# Altium PCB nexnclock_one_mainboard_rev_1_0.PcbDoc (part 1 of 2)
Units mm, origin at the board's own origin, x right, y up, seen from the top; angles counter-clockwise.
Board outline 106 x 35 mm, 2 copper layers (Top Layer, Bottom Layer), stack 1.571 mm thick; 128 components, 112 nets, 447 pads, 312 vias.
Unrouted connection lines stored in the file: 3.
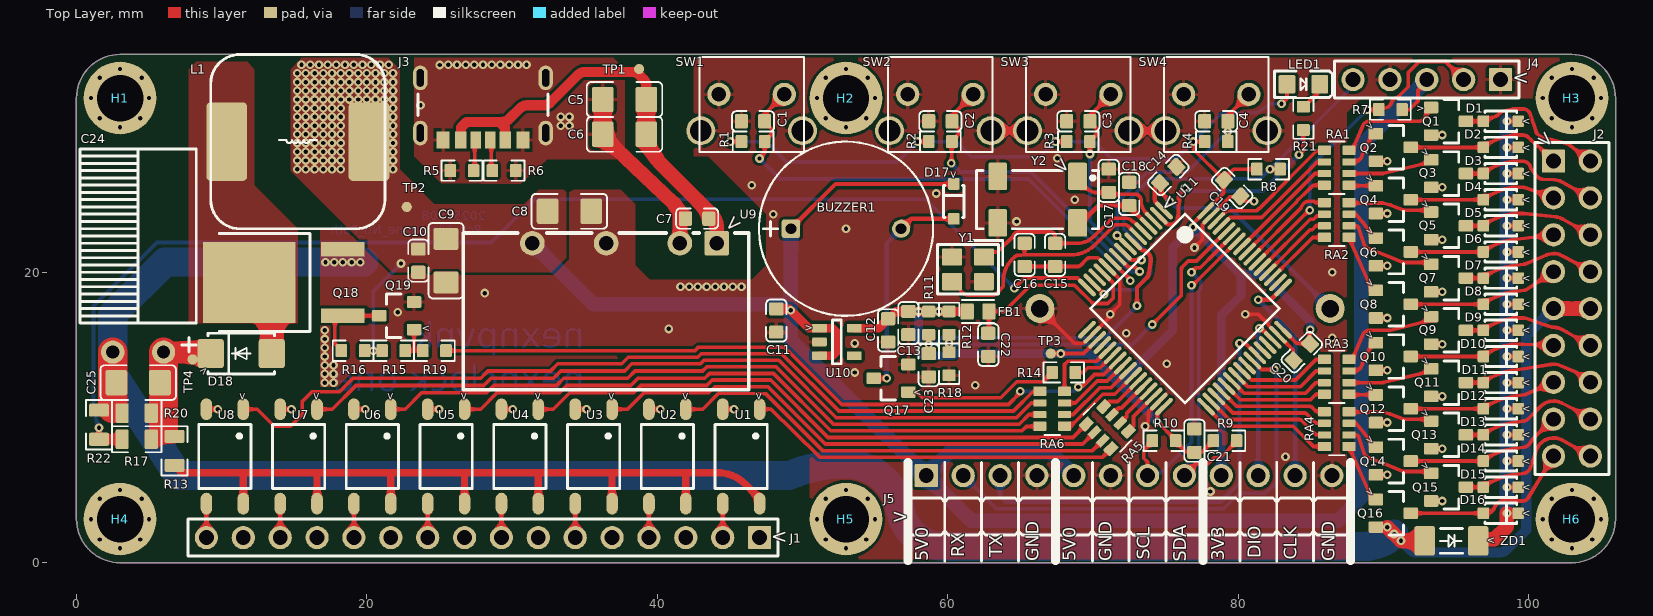
[diagram p0: Top Layer view]
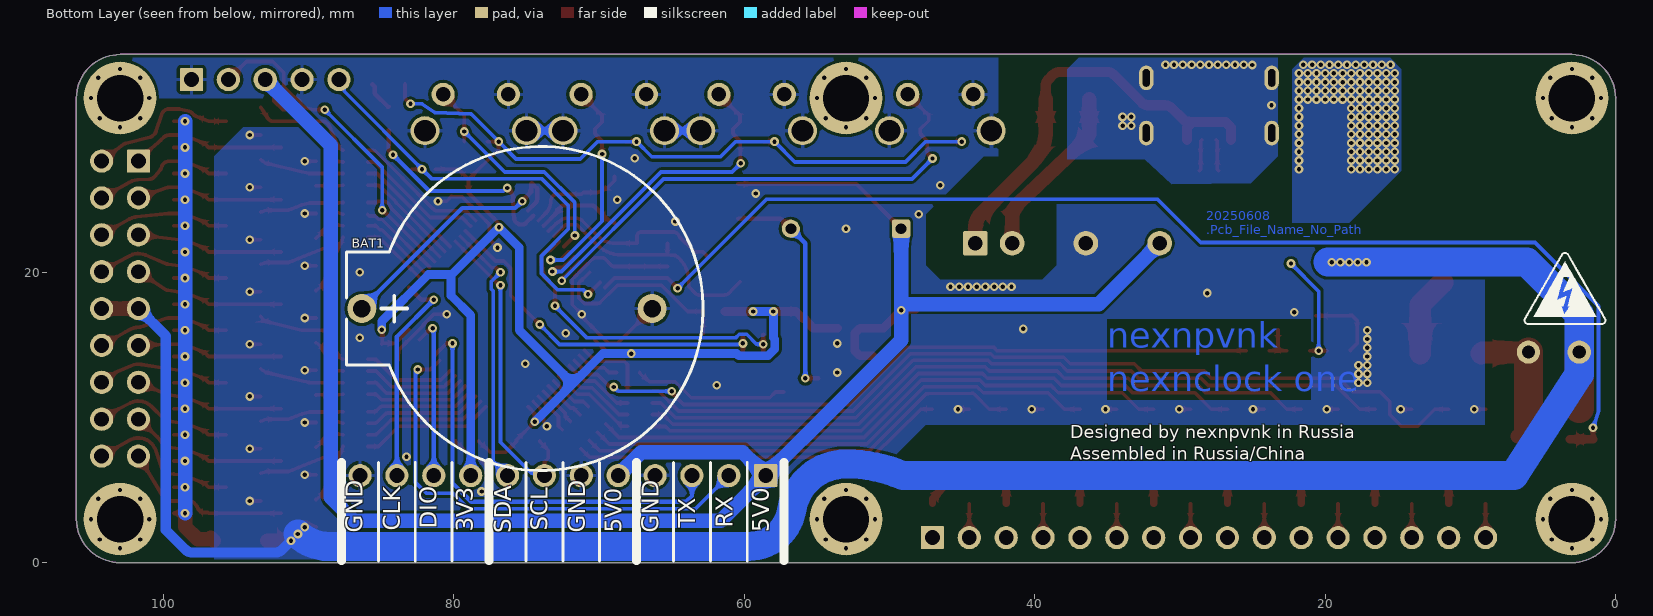
[diagram p1: Bottom Layer view, seen from below]
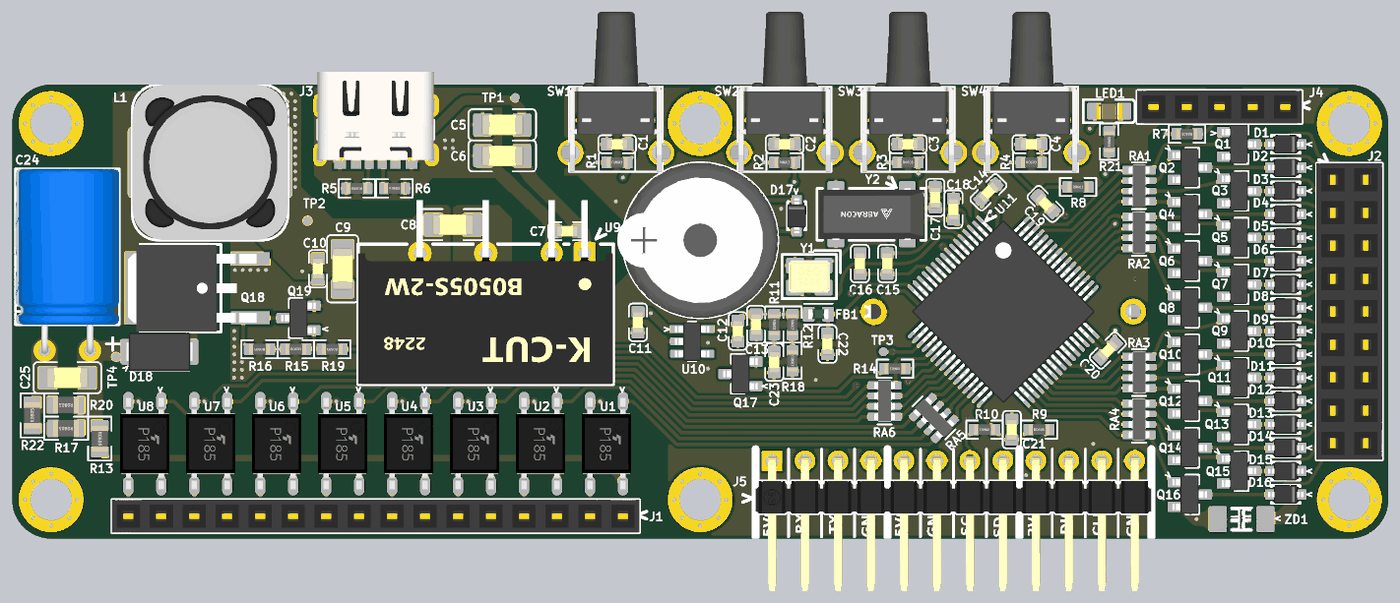
[diagram p3: 3D render of the assembled board from above, using the file's embedded part models]

## Layer stack, top to bottom
Top Solder: solder mask 0.0102, Solder Resist, Dk 3.5
Top Layer: signal copper 0.0356
Dielectric 1: dielectric 1.5, FR-4, Dk 4.8
Bottom Layer: signal copper 0.0356
Bottom Solder: solder mask 0.0102, Solder Resist, Dk 3.5

## Board outline
0,3 0,32 cw(c3,32) 3,35 103,35 cw(c103,32) 106,32 106,3 cw(c103,3) 103,0 3,0 cw(c3,3)

## Design rules (kind name [scope] priority, off if disabled: settings)
Clearance [All] p1: gap=0.2 ignorepadtopadclearanceinfootprint=FALSE except(0: Arc-Text Track-Text SMDPad-Text THPad-Text Via-Text Fill-Text Poly-Text Region-Text Text-Text; 0.127: THPad-THPad; 0.3: Arc-THPad Track-THPad SMDPad-THPad)
ComponentClearance ComponentClearance_1 [(Footprint = 'B_S-2WR2_FLAT')] p1: gap=-5 collisioncheckmode=3 verticalgap=-5 showdistances=FALSE
ComponentClearance [All] p2: gap=0 collisioncheckmode=3 verticalgap=0 showdistances=FALSE
DiffPairsRouting [All] p1: maxlimit=1 minlimit=0.127 mostfreqgap=0.3 toplayer_minwidth=0.127 toplayer_maxwidth=0.381 toplayer_prefwidth=0.3 bottomlayer_minwidth=0.127 bottomlayer_maxwidth=0.381 bottomlayer_prefwidth=0.3 maxuncoupledlength=12.7
Height [All] p1: minheight=0 maxheight=100 prefheight=12.7
HoleSize [All] p1: absolutevalues=TRUE maxlimit=5 minlimit=0.025 maxpercent=80.000 minpercent=20.000
HoleToHoleClearance [All] p1: gap=0.127 allowstackedmicrovias=TRUE
MinimumSolderMaskSliver [All] p1: minsoldermaskwidth=0.05
PolygonConnect PolygonConnect_1 [All] p1: thpad.connectstyle=Relief thpad.reliefconductorwidth=0.254 thpad.reliefentries=4 thpad.polygonreliefangle="90 Angle" thpad.airgapwidth=0.2 smdpad.connectstyle=Relief smdpad.reliefconductorwidth=0.254 smdpad.reliefentries=4 smdpad.polygonreliefangle="90 Angle" smdpad.airgapwidth=0.2 via.connectstyle=Direct via.reliefconductorwidth=0.254 via.reliefentries=4 via.polygonreliefangle="90 Angle" via.airgapwidth=0.254
RoutingVias [All] p1: holewidth=0.3 width=0.6 viastyle="Through Hole" minholewidth=0.1 minwidth=0.3 maxholewidth=1 maxwidth=1.27
SilkToSilkClearance [All] p1: silktosilkclearance=0
SilkToSolderMaskClearance [IsPad] p1: minsilkscreentomaskgap=0.127 clearancetoexposedcopper=TRUE
SolderMaskExpansion [All] p1: expansion=0.05 istentingtop=FALSE
SupplyNets "Schematic Supply Nets_6" [InNet('VCC_3V3')] p1: voltage=0.000
SupplyNets "Schematic Supply Nets_5" [InNet('VBUS')] p2: voltage=0.000
SupplyNets "Schematic Supply Nets_4" [InNet('RAW_GND')] p3: voltage=0.000
SupplyNets "Schematic Supply Nets_3" [InNet('VCC_HV')] p4: voltage=0.000
SupplyNets "Schematic Supply Nets_1" [InNet('VCC_5V0')] p5: voltage=0.000
SupplyNets "Schematic Supply Nets" [InNet('GND')] p6: voltage=0.000
Width [All] p1: maxlimit=6 minlimit=0.2 preferedwidth=0.3
22 further rules are at their usual default settings.

## Classes and differential pairs
component class hot_handle_part: D1 D2 D3 D4 D5 D6 D7 D8 D9 D10 D11 D12 D13 D14 D15 D16 J1 J2 Q1 Q2 Q3 Q4 Q5 Q6 Q7 Q8 Q9 Q10 Q11 Q12 Q13 Q14 Q15 Q16 RA1 RA2 RA3 RA4 RA5 RA6 U1 U2 U3 U4 U5 U6 U7 U8 ZD1
component class main: BAT1 BUZZER1 C1 C2 C3 C4 C5 C6 C7 C8 C9 C10 C11 C12 C13 C14 C15 C16 C17 C18 C19 C20 C21 C22 C23 C24 C25 D17 D18 FB1 H1 H2 H3 H4 H5 H6 J3 J4 J5 L1 LED1 Q17 Q18 Q19 R1 R2 R3 R4 R5 R6 R7 R8 R9 R10 R11 R12 R13 R14 R15 R16 R17 R18 R19 R20 R21 R22 SW1 SW2 SW3 SW4 TP1 TP2 TP3 TP4 U9 U10 U11 Y1 Y2

## Components (designator, comment, footprint, x,y, rotation, side; value= is the part's Value field where it differs from the comment)
BAT1 "BATTERY" CR2032 74,17.5 r0 bottom locked
BUZZER1 "BUZZER" BUZZER 53,23 r0 top locked
C1 "CAP" C0603 46.6,30.4 r180 top value=100nF
C2 "CAP" C0603 59.5,30.4 r180 top value=100nF
C3 "CAP" C0603 69,30.4 r180 top value=100nF
C4 "CAP" C0603 78.5,30.4 r180 top value=100nF
C5 "CAP" C1206 37.75,31.9 r180 top value=10uF
C6 "CAP" C1206 37.75,29.5 r180 top value=10uF
C7 "CAP" C0603 42.75,23.7 r180 top value=100nF
C8 "CAP" C1206 33.95,24.2 r0 top value=10uF
C9 "CAP" C1206 25.45,20.8 r270 top value=10uF
C10 "CAP" C0603 23.55,20.8 r270 top value=100nF
C11 "CAP" C0603 48.2,16.675 r270 top value=1uF
C12 "CAP" C0603 55.9,16 r270 top value=1uF
C13 "CAP" C0603 57.3,16.5 r270 top value=100nF
C14 "CAP" C0603 75.2,26.7 r45 top value=100nF
C15 "CAP" C0603 67.4,21.2 r270 top value=22pF
C16 "CAP" C0603 65.3,21.2 r270 top value=22pF
C17 "CAP" C0603 71.1,26.3 r90 top value=22pF
C18 "CAP" C0603 72.5,25.4 r90 top value=22pF
C19 "CAP" C0603 79.6,25.8 r315 top value=100nF
C20 "CAP" C0603 84.4,14.5 r225 top value=100nF
C21 "CAP" C0603 77,8.4 r90 top value=100nF
C22 "CAP" C0603 62.8,15 r270 top value=100nF
C23 "CAP" C0603 58.7,13.6 r270 top value=100nF
C24 "CAP_POLAR" CAP-TH_D8.0_L12.0_P3.5_RA_FLAT 4.25,14.5 r180 top value=8.2uF
C25 "CAP" C1206 4.25,12.4 r180 top value=100nF
D1 "DIODE" "SOD323 (SC-76A)" 98.1,30.4 r180 top
D2 "DIODE" "SOD323 (SC-76A)" 98.1,28.6 r180 top
D3 "DIODE" "SOD323 (SC-76A)" 98.1,26.8 r180 top
D4 "DIODE" "SOD323 (SC-76A)" 98.1,25 r180 top
D5 "DIODE" "SOD323 (SC-76A)" 98.1,23.2 r180 top
D6 "DIODE" "SOD323 (SC-76A)" 98.1,21.4 r180 top
D7 "DIODE" "SOD323 (SC-76A)" 98.1,19.6 r180 top
D8 "DIODE" "SOD323 (SC-76A)" 98.1,17.8 r180 top
D9 "DIODE" "SOD323 (SC-76A)" 98.1,16 r180 top
D10 "DIODE" "SOD323 (SC-76A)" 98.1,14.2 r180 top
D11 "DIODE" "SOD323 (SC-76A)" 98.1,12.4 r180 top
D12 "DIODE" "SOD323 (SC-76A)" 98.1,10.6 r180 top
D13 "DIODE" "SOD323 (SC-76A)" 98.1,8.8 r180 top
D14 "DIODE" "SOD323 (SC-76A)" 98.1,7 r180 top
D15 "DIODE" "SOD323 (SC-76A)" 98.1,5.2 r180 top
D16 "DIODE" "SOD323 (SC-76A)" 98.1,3.4 r180 top
D17 "DIODE" "SOD323 (SC-76A)" 60.429,24.884 r270 top
D18 "DIODE" "SMA (DO-214AC)" 11.35,14.4 r0 top
FB1 "BEAD" L0603 62.1,17.3 r0 top value=600Ω@100MHz
H1 "MOUNT_HOLE" MOUNT_HOLE_D_3_2_MM 3,32 r0 top
H2 "MOUNT_HOLE" MOUNT_HOLE_D_3_2_MM 53,32 r0 top locked
H3 "MOUNT_HOLE" MOUNT_HOLE_D_3_2_MM 103,32 r0 top locked
H4 "MOUNT_HOLE" MOUNT_HOLE_D_3_2_MM 3,3 r0 top
H5 "MOUNT_HOLE" MOUNT_HOLE_D_3_2_MM 53,3 r0 top locked
H6 "MOUNT_HOLE" MOUNT_HOLE_D_3_2_MM 103,3 r0 top locked
J1 "F_HEADER_1X16" F_HEADER_STRAIGHT_2_54_1X16 28,1.73 r180 top
J2 "F_HEADER_2X9" F_HEADER_STRAIGHT_2_54_2X9 103,17.5 r270 top locked
J3 "USB_TYPE_C_FEMALE_POWER_6_PIN" USB_TYPE_C_SMD_FEMALE_POWER_6_PIN 28,31.25 r90 top
J4 "F_HEADER_1X5" F_HEADER_STRAIGHT_2_54_1X5 93,33.27 r180 top locked
J5 "P_HEADER_1X12" P_HEADER_RIGHT_ANGLE_2_54_1X12 72.5,6 r0 top locked
L1 "POWER_INDUCTOR" CD127 15.25,29 r180 top value=220uH
LED1 "LED" LED0805 84.5,32.95 r0 top
Q1 "NPN" "SOT23-3 (TO-236)" 94.5,30.4 r0 top
Q2 "NPN" "SOT23-3 (TO-236)" 90.7,28.6 r0 top
Q3 "NPN" "SOT23-3 (TO-236)" 94.5,26.8 r0 top
Q4 "NPN" "SOT23-3 (TO-236)" 90.7,25 r0 top
Q5 "NPN" "SOT23-3 (TO-236)" 94.5,23.2 r0 top
Q6 "NPN" "SOT23-3 (TO-236)" 90.7,21.4 r0 top
Q7 "NPN" "SOT23-3 (TO-236)" 94.5,19.6 r0 top
Q8 "NPN" "SOT23-3 (TO-236)" 90.7,17.8 r0 top
Q9 "NPN" "SOT23-3 (TO-236)" 94.5,16 r0 top
Q10 "NPN" "SOT23-3 (TO-236)" 90.7,14.2 r0 top
Q11 "NPN" "SOT23-3 (TO-236)" 94.5,12.4 r0 top
Q12 "NPN" "SOT23-3 (TO-236)" 90.7,10.6 r0 top
Q13 "NPN" "SOT23-3 (TO-236)" 94.5,8.8 r0 top
Q14 "NPN" "SOT23-3 (TO-236)" 90.7,7 r0 top
Q15 "NPN" "SOT23-3 (TO-236)" 94.5,5.2 r0 top
Q16 "NPN" "SOT23-3 (TO-236)" 90.7,3.4 r0 top
Q17 "NPN" "SOT23-3 (TO-236)" 56.1,12.7 r180 top
Q18 "MOSFET N" "DPAK (TO-252-3)" 14.25,19.3 r90 top
Q19 "NPN" "SOT23-3 (TO-236)" 22.05,17 r180 top
R1 "RESISTOR" R0603 46.6,29 r0 top value=5.1k
R2 "RESISTOR" R0603 59.5,29 r0 top value=5.1k
R3 "RESISTOR" R0603 69,29 r0 top value=5.1k
R4 "RESISTOR" R0603 78.5,29 r0 top value=5.1k
R5 "RESISTOR" R0603 26.55,27 r180 top value=5.1k
R6 "RESISTOR" R0603 29.45,27 r0 top value=5.1k
R7 "RESISTOR" R0603 90.5,31.2 r180 top value=100R
R8 "RESISTOR" R0603 82.1,27.1 r0 top value=5.1k
R9 "RESISTOR" R0603 79.1,8.4 r0 top value=5.1k
R10 "RESISTOR" R0603 74.9,8.4 r180 top value=5.1k
R11 "RESISTOR" R0603 58.7,16.5 r270 top value=5.1k
R12 "RESISTOR" R0603 60.1,16.5 r270 top value=5.1k
R13 "RESISTOR" R0805 6.75,7.7 r270 top value=10k
R14 "RESISTOR" R0603 68,13.1 r180 top value=100R
R15 "RESISTOR" R0603 21.85,14.6 r0 top value=5.1k
R16 "RESISTOR" R0603 19.05,14.6 r180 top value=100R
R17 "RESISTOR" R0805 4.15,8.5 r180 top value=1M
R18 "RESISTOR" R0603 60.1,13.7 r270 top value=5.1k
R19 "RESISTOR" R0603 24.65,14.6 r180 top value=100R
R20 "RESISTOR" R0805 4.15,10.3 r180 top value=300k
R21 "RESISTOR" R0603 84.5,30.6 r270 top value=5.1k
R22 "RESISTOR" R0805 1.55,9.5 r90 top value=10k
RA1 "RESISTOR_ARRAY_X4" RA0603X4_CONVEX 86.8,27.2 r90 top value=1k
RA2 "RESISTOR_ARRAY_X4" RA0603X4_CONVEX 86.8,23.6 r90 top value=1k
RA3 "RESISTOR_ARRAY_X4" RA0603X4_CONVEX 86.8,12.8 r90 top value=1k
RA4 "RESISTOR_ARRAY_X4" RA0603X4_CONVEX 86.8,9.2 r90 top value=1k
RA5 "RESISTOR_ARRAY_X4" RA0603X4_CONVEX 71,9.3 r315 top value=1k
RA6 "RESISTOR_ARRAY_X4" RA0603X4_CONVEX 67.2,10.6 r270 top value=1k
SW1 "TACTILE_SWITCH" KLS7-TS6606 46.5,31 r90 top locked
SW2 "TACTILE_SWITCH" KLS7-TS6606 59.5,31 r90 top locked
SW3 "TACTILE_SWITCH" KLS7-TS6606 69,31 r90 top locked
SW4 "TACTILE_SWITCH" KLS7-TS6606 78.5,31 r90 top locked
TP1 "TEST_POINT" TEST_POINT_D_0_7 38.75,34 r0 top
TP2 "TEST_POINT" TEST_POINT_D_0_7 22.75,24.5 r0 top
TP3 "TEST_POINT" TEST_POINT_D_0_7 67.1,14.4 r0 top
TP4 "TEST_POINT" TEST_POINT_D_0_7 8,14 r0 top
U1 "PHOTOCOUPLER_DARLINGTON" SOP4 45.78,7.318 r270 top
U2 "PHOTOCOUPLER_DARLINGTON" SOP4 40.7,7.318 r270 top
U3 "PHOTOCOUPLER_DARLINGTON" SOP4 35.62,7.318 r270 top
U4 "PHOTOCOUPLER_DARLINGTON" SOP4 30.54,7.318 r270 top
U5 "PHOTOCOUPLER_DARLINGTON" SOP4 25.46,7.318 r270 top
U6 "PHOTOCOUPLER_DARLINGTON" SOP4 20.38,7.318 r270 top
U7 "PHOTOCOUPLER_DARLINGTON" SOP4 15.3,7.318 r270 top
U8 "PHOTOCOUPLER_DARLINGTON" SOP4 10.22,7.318 r270 top
U9 "B_S-2WR2" B_S-2WR2_FLAT 37.75,22 r180 top locked
U10 "RT9193" SOT23-5 52.375,15.2 r0 top
U11 "XXX32F051RXXX" LQFP64 76.35,17.5 r315 top locked
Y1 "CRYSTAL_4P" SMD3225_4P 61.4,20.2 r180 top
Y2 "CRYSTAL_32768_HZ" MC-306 66.2,25 r180 top
ZD1 "DIODE_ZENER" "SOD80 (MiniMELF)" 94.7,1.5 r180 top

## Footprints (in the part's own frame and the unit in brackets; to place one, negate y for a bottom-side part, rotate by r counter-clockwise, add the part's x,y. Pads: shape width x height; smd on the part's side, far side on the other; paste and mask are expansions set on the pad)
B_S-2WR2_FLAT [mm]
  rrect20% 1.7x1.7 hole 1 mask+0.05: 1(-6.35,0)
  round 1.7 hole 1 mask+0.05: 2(-3.81,0) 4(1.27,0) 6(6.35,0)
  silkscreen extent -8.56,-0.7 11.1,10.1, body extent -8.53,-4.1 11.07,10.1, height 7.1
BUZZER [mm]
  rrect20% 1.25x1.25 hole 0.75 paste-2539.97 mask+0.05: 1(-3.8,0)
  round 1.25 hole 0.75 paste-2539.97 mask+0.05: 2(3.8,0)
  silkscreen extent -6,-6 6,6, body extent -6.38,-6 6,6, height 9.5
C0603 [mm]
  rrect25% 0.9x1 smd mask+0.05: 1(-0.8,0) 2(0.8,0)
  silkscreen extent -1.45,-0.7 1.45,0.7, body extent -0.8,-0.4 0.8,0.4, height 0.82
C1206 [mm]
  rrect20% 1.5x1.75 smd mask+0.05: 1(-1.5,0) 2(1.5,0)
  silkscreen extent -2.6,-1.2 2.6,1.2, body extent -1.6,-0.8 1.6,0.8, height 1.62
CAP-TH_D8.0_L12.0_P3.5_RA_FLAT [mm]
  round 1.6 hole 0.9 mask+0.05: 1(-1.75,0) 2(1.75,0)
  silkscreen extent -4,-14 4,0, body extent -4,-14 4,0.25, height 8.1
CD127 [mm]
  rrect20% 2.8x5.4 smd mask+0.05: 1(-4.9,0) 2(4.9,0)
  silkscreen extent -6,-6 6,6, body extent -6,-6 6,6, height 7.46
CR2032 [mm] "KLS5-CR2032-01 (BH-642) (CH224-2032)"
  round 2 hole 1.2 mask+0.05: 1(12.35,0) 2(-7.65,0)
  silkscreen extent -11.16,-11.16 13.4,11.16, body extent -11.15,-11.15 13.15,11.15, height 8.5
"DPAK (TO-252-3)" [mm]
  rect 1x3 smd mask+0.05: 1(-2.28,-4.1) 2(2.28,-4.1)
  rect 5.6x6.4 smd mask+0.05: 3(0,2.35)
  silkscreen extent -3.38,-1.84 3.38,4.41, body extent -3.35,-4.57 3.35,5.34, height 2.39
F_HEADER_STRAIGHT_2_54_1X5 [mm]
  rrect10% 1.6x1.6 hole 1.02 paste-2539.97 mask+0.05: 1(-5.08,0)
  round 1.6 hole 1.02 paste-2539.97 mask+0.05: 2(-2.54,0) 3(0,0)
  round 1.6 hole 1.02 mask+0.05: 4(2.54,0) 5(5.08,0)
  silkscreen extent -6.35,-1.27 6.35,1.27, body extent -6.35,-1.27 6.35,1.27, height 8.5
F_HEADER_STRAIGHT_2_54_1X16 [mm]
  rrect10% 1.6x1.6 hole 1.02 paste-2539.97 mask+0.05: 1(-19.05,0)
  round 1.6 hole 1.02 paste-2539.97 mask+0.05: 2(-16.51,0) 3(-13.97,0)
  round 1.6 hole 1.02 mask+0.05: 4(-11.43,0) 5(-8.89,0) 6(-6.35,0) 7(-3.81,0) 8(-1.27,0) 9(1.27,0) 10(3.81,0) 11(6.35,0) 12(8.89,0) 13(11.43,0) 14(13.97,0) 15(16.51,0) 16(19.05,0)
  silkscreen extent -20.32,-1.27 20.32,1.27, body extent -20.32,-1.27 20.32,1.27, height 8.5
F_HEADER_STRAIGHT_2_54_2X9 [mm]
  rrect10% 1.6x1.6 hole 1.02 paste-2539.97 mask+0.05: 1(-10.16,-1.27)
  round 1.6 hole 1.02 paste-2539.97 mask+0.05: 2(-10.16,1.27) 3(-7.62,-1.27)
  round 1.6 hole 1.02 mask+0.05: 4(-7.62,1.27) 5(-5.08,-1.27) 6(-5.08,1.27) 7(-2.54,-1.27) 8(-2.54,1.27) 9(0,-1.27) 10(0,1.27) 11(2.54,-1.27) 12(2.54,1.27) 13(5.08,-1.27) 14(5.08,1.27) 15(7.62,-1.27) 16(7.62,1.27) 17(10.16,-1.27) 18(10.16,1.27)
  silkscreen extent -11.43,-2.54 11.43,2.54, body extent -11.43,-2.54 11.43,2.54, height 8.5
KLS7-TS6606 [mm]
  round 1.6 hole 1 mask+0.05: 1(1.25,-2.25) 2(1.25,2.25)
  round 2 hole 1.5 mask+0.05: 3(-1.25,3.5) 4(-1.25,-3.5)
  silkscreen extent -2.73,-3.6 3.83,3.6, body extent -2.75,-4.21 9.6,4.21, height 7.06
L0603 [mm]
  rrect20% 0.91x1.12 smd mask+0.05: 1(-0.75,0) 2(0.75,0)
  silkscreen extent -1.1,-0.8 1.1,0.8, body extent -0.8,-0.4 0.8,0.4, height 0.81
LED0805 [mm]
  rrect20% 1.15x1.3 smd paste+0 mask+0.05: 1(-1.125,0) 2(1.125,0)
  silkscreen extent -2,-0.9 2,0.9, body extent -1.8,-0.77 1.8,0.77, height 0.25
LQFP64 [mm]
  oval 1.6x0.3 smd mask+0.05: 1(-5.8,3.75) 2(-5.8,3.25) 3(-5.8,2.75) 4(-5.8,2.25) 5(-5.8,1.75) 6(-5.8,1.25) 7(-5.8,0.75) 8(-5.8,0.25) 9(-5.8,-0.25) 10(-5.8,-0.75) 11(-5.8,-1.25) 12(-5.8,-1.75) 13(-5.8,-2.25) 14(-5.8,-2.75) 15(-5.8,-3.25) 16(-5.8,-3.75) 33(5.8,-3.75) 34(5.8,-3.25) 35(5.8,-2.75) 36(5.8,-2.25) 37(5.8,-1.75) 38(5.8,-1.25) 39(5.8,-0.75) 40(5.8,-0.25) 41(5.8,0.25) 42(5.8,0.75) 43(5.8,1.25) 44(5.8,1.75) 45(5.8,2.25) 46(5.8,2.75) 47(5.8,3.25) 48(5.8,3.75)
  oval 0.3x1.6 smd mask+0.05: 17(-3.75,-5.8) 18(-3.25,-5.8) 19(-2.75,-5.8) 20(-2.25,-5.8) 21(-1.75,-5.8) 22(-1.25,-5.8) 23(-0.75,-5.8) 24(-0.25,-5.8) 25(0.25,-5.8) 26(0.75,-5.8) 27(1.25,-5.8) 28(1.75,-5.8) 29(2.25,-5.8) 30(2.75,-5.8) 31(3.25,-5.8) 32(3.75,-5.8) 49(3.75,5.8) 50(3.25,5.8) 51(2.75,5.8) 52(2.25,5.8) 53(1.75,5.8) 54(1.25,5.8) 55(0.75,5.8) 56(0.25,5.8) 57(-0.25,5.8) 58(-0.75,5.8) 59(-1.25,5.8) 60(-1.75,5.8) 61(-2.25,5.8) 62(-2.75,5.8) 63(-3.25,5.8) 64(-3.75,5.8)
  silkscreen extent -4.6,-4.6 4.6,4.6, body extent -6,-6 6,6, height 1.6
MC-306 [mm]
  rrect20% 1.3x1.9 smd paste+0 mask+0.05: 1(-2.75,-1.6) 2(2.75,-1.6) 3(2.75,1.6) 4(-2.75,1.6)
  silkscreen extent -4.2,-2 4.2,2, body extent -4.3,-2.65 4.3,2.65, height 0.25
MOUNT_HOLE_D_3_2_MM [mm]
  round 5 hole 3.2 mask+0.05: 1(0,0)
P_HEADER_RIGHT_ANGLE_2_54_1X12 [mm]
  rrect10% 1.6x1.6 hole 1.02 paste-2539.97 mask+0.05: 1(-13.97,0)
  round 1.6 hole 1.02 paste-2539.97 mask+0.05: 2(-11.43,0) 3(-8.89,0)
  round 1.6 hole 1.02 mask+0.05: 4(-6.35,0) 5(-3.81,0) 6(-1.27,0) 7(1.27,0) 8(3.81,0) 9(6.35,0) 10(8.89,0) 11(11.43,0) 12(13.97,0)
  silkscreen extent -15.23,-4.09 15.25,-1.55, body extent -15.24,-10.05 15.24,0.31, height 2.52
R0603 [mm]
  rrect20% 0.8x0.9 smd mask+0.05: 1(-0.8,0) 2(0.8,0)
  silkscreen extent -1.4,-0.7 1.4,0.7, body extent -0.8,-0.4 0.8,0.4, height 0.43
R0805 [mm]
  rrect20% 0.9x1.35 smd mask+0.05: 1(-1,0) 2(1,0)
  silkscreen extent -1.7,-0.9 1.7,0.9, body extent -1,-0.63 1,0.63, height 0.53
RA0603X4_CONVEX [mm]
  rrect20% 0.65x0.9 smd mask+0.05: 1(-1.2,-0.85) 4(1.2,-0.85) 5(1.2,0.85) 8(-1.2,0.85)
  rrect20% 0.5x0.9 smd mask+0.05: 2(-0.4,-0.85) 3(0.4,-0.85) 6(0.4,0.85) 7(-0.4,0.85)
  silkscreen extent -1.8,-0.55 1.8,0.55, body extent -1.6,-0.8 1.6,0.8, height 0.6
"SMA (DO-214AC)" [mm]
  rrect20% 1.8x2 smd mask+0.05: 1(-2.1,0) 2(2.1,0)
  silkscreen extent -2.3,-1.4 2.3,1.4, body extent -2.6,-1.48 2.6,1.48, height 2.5
SMD3225_4P [mm]
  rrect20% 1.4x1.2 smd mask+0.05: 1(-1.1,-0.85) 2(1.1,-0.85) 3(1.1,0.85) 4(-1.1,0.85)
  silkscreen extent -2.4,-2 2.1,1.7, body extent -1.6,-1.25 1.6,1.25, height 0.65
"SOD80 (MiniMELF)" [mm] "SOD80 - MiniMELF - MMA - DO-213AA"
  rrect20% 1.4x2.03 smd mask+0.05: 1(-1.84,0) 2(1.84,0)
  silkscreen extent -0.77,-0.85 0.8,0.85, body extent -1.75,-0.85 1.75,0.85, height 1.7
"SOD323 (SC-76A)" [mm]
  rrect20% 0.8x0.8 smd mask+0.05: 1(-1.2,0) 2(1.2,0)
  silkscreen extent -1.1,-0.7 1.1,0.7, body extent -1.35,-0.72 1.35,0.72, height 1.15
SOP4 [mm]
  oval 1.5x0.8 smd mask+0.05: 1(-3.25,1.27) 3(-3.25,-1.27) 4(3.25,-1.27) 6(3.25,1.27)
  silkscreen extent -2.2,-1.8 2.2,1.8, body extent -3.51,-1.9 3.51,1.9, height 2.2
"SOT23-3 (TO-236)" [mm]
  rrect20% 1x0.8 smd mask+0.05: 1(-1.2,0.95) 2(-1.2,-0.95) 3(1.2,0)
  silkscreen extent -0.3,-1.5 0.7,1.5, body extent -1.32,-1.5 1.32,1.5, height 1.1
SOT23-5 [mm]
  rrect20% 1x0.6 smd mask+0.05: 1(-1.2,0.95) 2(-1.2,0) 3(-1.2,-0.95) 4(1.2,-0.95) 5(1.2,0.95)
  silkscreen extent -0.3,-1.5 0.3,1.5, body extent -1.32,-1.5 1.32,1.5, height 1.3
TEST_POINT_D_0_7 [mm]
  round 0.7 smd mask+0.05: 1(0,0)
USB_TYPE_C_SMD_FEMALE_POWER_6_PIN [mm]
  rect 1.2x0.9 smd mask+0.05: 1(-2.14,2.75) 6(-2.14,-2.75)
  rect 1.2x0.8 smd mask+0.05: 2(-2.14,1.52) 5(-2.14,-1.52)
  rect 1.2x0.7 smd mask+0.05: 3(-2.14,0.5) 4(-2.14,-0.5)
  oval 1.7x1 hole 0.5 slot 1.2 at 0 deg mask+0.05: 7(-1.66,-4.32) 8(2.14,-4.32) 9(-1.66,4.32) 10(2.14,4.32)
  silkscreen extent -0.46,-4.47 1.02,4.47, body extent -2.13,-4.47 4.74,4.47, height 3.4

## Part data
BAT1 BUZZER1 D18 H1 H2 H3 H4 H5 H6 J3 J5 LED1 Q1 Q2 Q3 Q4 Q5 Q6 Q7 Q8 Q9 Q10 Q11 Q12 Q13 Q14 Q15 Q16 Q17 Q19 SW1 SW2 SW3 SW4 TP1 TP2 TP3 TP4 Y1 Y2: Manufacturer=_manufacturer
  BAT1: Part Reference=_part, PCB Footprint=CR2032, Procurement Type=DNP
  BUZZER1: Part Reference=_part, PCB Footprint=BUZZER
  D18: Part Reference=ES1J, PCB Footprint="SMA (DO-214AC)"
  H1 H2 H3 H4 H5 H6: PCB Footprint=MOUNT_HOLE_D_3_2_MM, Procurement Type=DNP
  J3: Part Reference="TYPE-C 6P(073)", PCB Footprint=USB_TYPE_C_SMD_FEMALE_POWER_6_PIN
  J5: Part Reference=_part, PCB Footprint=P_HEADER_RIGHT_ANGLE_2_54_1X12, Procurement Type=DNP
  LED1: Part Reference=_part, PCB Footprint=LED0805
  Q1 Q2 Q3 Q4 Q5 Q6 Q7 Q8 Q9 Q10 Q11 Q12 Q13 Q14 Q15 Q16 Q17 Q19: Part Reference=MMBTA42LT1, PCB Footprint="SOT23-3 (TO-236)"
  SW1 SW2 SW3 SW4: Part Reference=_part, PCB Footprint=KLS7-TS6606
  TP1 TP2 TP3 TP4: Part Reference=_part, PCB Footprint=TEST_POINT_D_0_7
  Y1: Part Reference=_part, PCB Footprint=SMD3225_4P
  Y2: Part Reference=_part, PCB Footprint=MC-306
C1 C2 C3 C4 C7 C10 C13 C14 C19 C20 C21 C22 C23: Dielectric=X7R, Manufacturer=YAGEO, Voltage=50V, Part Reference=CC0603KRX7R9BB104, PCB Footprint=C0603
C5 C6 C8 C9: Dielectric=X5R, Manufacturer=_manufacturer, Voltage=16V, Part Reference=FCC1206X106K160HT, PCB Footprint=C1206
C11 C12: Dielectric=X5R, Manufacturer=FOJAN, Voltage=16V, Part Reference=FCC0603X105K160CT, PCB Footprint=C0603
C15 C16 C17 C18: Dielectric=C0G, Manufacturer=_manufacturer, Voltage=50V, Part Reference=FCC0603N220J500CT, PCB Footprint=C0603
C24: "CAP ALUM 8.2uF ±20% 400V TH", Dielectric=_dielectric, Manufacturer=AISHI, Voltage=400V, Part Reference=ERK2GM8R2F12OT, PCB Footprint=CAP-TH_D8.0_L12.0_P3.5_RA_FLAT
C25: Dielectric=X5R, Manufacturer=_manufacturer, Voltage=10V, Part Reference=_part, PCB Footprint=C1206
D1 D2 D3 D4 D5 D6 D7 D8 D9 D10 D11 D12 D13 D14 D15 D16 D17: Manufacturer="HXY MOSFET", Part Reference=1N4007WS, PCB Footprint="SOD323 (SC-76A)"
FB1: Current=1A, Manufacturer="FH (Guangdong Fenghua Advanced Tech)", Tolerancy=±25%, Part Reference=CBW160808U601T, PCB Footprint=L0603
J1: Manufacturer=HanElectricity, Part Reference=2541FV-16P-B, PCB Footprint=F_HEADER_STRAIGHT_2_54_1X16
J2: Manufacturer=ZHOURI, Part Reference=PM2.54-2*9, PCB Footprint=F_HEADER_STRAIGHT_2_54_2X9
J4: Manufacturer="CONNFLY Elec", Part Reference=DS1023-1x5SF11, PCB Footprint=F_HEADER_STRAIGHT_2_54_1X5
L1: Current=1.6A, Manufacturer=_manufacturer, Tolerancy=_tolerancy, Part Reference=PSPHAQ127-221M, PCB Footprint=CD127
Q18: Manufacturer="VBsemi Elec", Part Reference=IRFR825TRPBF-VB, PCB Footprint="DPAK (TO-252-3)"
R1 R2 R3 R4 R5 R6 R8 R9 R10 R11 R12 R15 R18 R21 RA1 RA2 RA3 RA4 RA5 RA6: Manufacturer=YAGEO, Tolerancy=5%
  R1 R2 R3 R4 R5 R6 R8 R9 R10 R11 R12 R15 R18 R21: Part Reference=RC0603JR-075K1L, PCB Footprint=R0603
  RA1 RA2 RA3 RA4 RA5 RA6: Part Reference=YC164-JR-07100RL, PCB Footprint=RA0603X4_CONVEX
R7 R13 R14 R16 R17 R19 R20 R22: Manufacturer=_manufacturer, Tolerancy=5%, Part Reference=_part
  R7 R14 R16 R19: PCB Footprint=R0603
  R13 R17 R20 R22: PCB Footprint=R0805
U1 U2 U3 U4 U5 U6 U7 U8: Manufacturer=UMW, Part Reference=TLP127GB-S, PCB Footprint=SOP4
U9: Manufacturer=EVISUN, Part Reference=B0505S-3WR2, PCB Footprint=B_S-2WR2_FLAT
U10: Manufacturer=TDSEMIC, Part Reference=RT9193-3.3, PCB Footprint=SOT23-5
U11: Manufacturer=ST, Part Reference=STM32F051R8T6, PCB Footprint=LQFP64
ZD1: Manufacturer=_manufacturer, Voltage=_voltage, Part Reference=_part, PCB Footprint="SOD80 (MiniMELF)"

## Via types
v1: diameter 0.6, hole 0.3, Top Layer to Bottom Layer, tented both sides, 264 vias
v2: diameter 0.6, hole 0.3, Top Layer to Bottom Layer, tented bottom, 48 vias

## Nets (pads, with @x,y where several pads share a name; then routed paths per layer and width w, separated by ;. In a path a pad name is that pad's centre, name@x,y a point inside that pad or via, vN(x,y) a via of type N, cw(c..) or ccw(c..) an arc to the next point about the centre after c; other vN are vias at no path point)
A0: RA5.4 U1.1 | length 25.8
  Top Layer w0.254: U1.1@47.05,10.568 47.813,10.576 51.121,7.34 51.195,7.268 51.299,7.268 51.303,7.264 70.661,7.264 RA5.4@71.247,7.85
A1: RA5.3 U2.1 | length 31.1
  Top Layer w0.254: U2.1@41.97,10.568 43.132,10.568 44.157,11.593 44.231,11.667 44.339,11.667 47.329,11.643 47.359,11.642 47.361,11.642 47.463,11.642 51.388,7.718 69.984,7.718 RA5.3@70.682,8.416
A2: RA5.2 U3.1 | length 35.8
  Top Layer w0.254: U3.1@36.89,10.568 37.954,10.568 39.086,11.7 43.552,11.7 43.974,12.122 47.626,12.122 51.576,8.172 69.306,8.172 RA5.2@70.116,8.982
A3: RA5.1 U4.1 | length 40.6
  Top Layer w0.254: U4.1@31.81,10.568 32.846,10.568 33.978,11.7 38.378,11.7 38.878,12.2 43.41,12.2 43.786,12.576 47.814,12.576 51.764,8.626 68.629,8.626 RA5.1@69.55,9.547
A4: RA6.4 U5.1 | length 42.4
  Top Layer w0.254: U5.1@26.73,10.568 27.839,10.568 28.971,11.7 33.271,11.7 33.771,12.2 38.171,12.2 38.671,12.7 43.268,12.7 43.598,13.03 48.002,13.03 51.952,9.08 65.123,9.08 65.427,9.384 RA6.4@66.35,9.384
A5: RA6.3 U6.1 | length 47.8
  Top Layer w0.254: U6.1@21.65,10.568 22.638,10.568 23.77,11.7 28.264,11.7 28.764,12.2 33.064,12.2 33.564,12.7 37.964,12.7 38.464,13.2 43.126,13.2 43.41,13.484 48.19,13.484 52.14,9.534 64.935,9.534 65.601,10.2 RA6.3@66.35,10.2
A6: RA6.2 U7.1 | length 53.2
  Top Layer w0.254: U7.1@16.57,10.568 17.625,10.568 19.257,12.2 28.057,12.2 28.557,12.7 32.857,12.7 33.357,13.2 37.757,13.2 38.249,13.692 42.976,13.692 43.222,13.938 48.378,13.938 52.328,9.988 64.747,9.988 65.759,11 RA6.2@66.35,11
A7: RA6.1 U8.1 | length 60.1
  Top Layer w0.254: U8.1@11.49,10.568 12.452,10.568 13.62,9.4 14.75,9.4 15.55,10.2 15.55,10.252 15.555,10.257 15.555,11.105 16.218,11.768 18.118,11.768 19.05,12.7 27.85,12.7 28.35,13.2 32.65,13.2 33.15,13.7 37.55,13.7 37.996,14.146 42.788,14.146 43.034,14.392 48.566,14.392 52.516,10.442 64.542,10.442 65.9,11.8 RA6.1@66.35,11.8
ADC_IN1: J4.5 R8.2 U11.15 | length 30.8
  Top Layer w0.254: U11.15@69.949,19.303 U11.15@69.951,19.303 v1(70.774,18.481) ; v1(82.2,27.1) R8.2@82.9,27.1
  Bottom Layer w0.254: v1(70.774,18.481) 71.081,18.788 72.845,18.788 73.977,19.919 73.977,20.802 73.977,21.123 72.126,22.974 72.126,24.601 73.975,26.45 81.55,26.45 81.728,26.628 v1(82.2,27.1) 87.564,32.464 87.564,32.55 87.92,32.906 J4.5@87.92,33.27
ADC_IN2: R17.2 R22.1 U11.16 | length 85.4
  Top Layer w0.254: R22.1@1.55,8.5 v1(1.55,9.3) ; v1(64.6,18.9) 65.3,19.6 68.947,19.6 U11.16@69.597,18.95
  Top Layer w0.6: R22.1@1.55,8.5 R17.2@3.15,8.5
  Bottom Layer w0.254: v1(1.55,9.3) 1.17,10.461 1.17,17.67 5.55,22.05 28.575,22.05 31.55,25.025 58.475,25.025 v1(64.6,18.9)
ADDRESS_LED_DATA_0: J4.2 R7.2 U11.54 | length 22.7
  Top Layer w0.254: U11.54@81.335,20.717 84.893,24.275 v1(84.95,24.275) ; v1(88.9,31.2) R7.2@89.7,31.2 89.95,31.267 90.21,31.337 ccw(c90.093,31.771) 90.411,31.453 90.453,31.495 ccw(c90.134,31.813) 90.566,31.688 cw(c90.98,31.57) 90.773,31.947 ; 90.773,31.947 91.009,32.077 ccw(c90.792,32.471) 91.111,32.153 91.73,32.772 91.73,33.768 92.482,34.52 94.29,34.52 J4.2@95.54,33.27
  Bottom Layer w0.254: v1(84.95,24.275) 84.95,27.25 v1(88.9,31.2)
ANODE_0: RA5.5 U11.30 | length 3
  Top Layer w0.254: RA5.5@72.55,9.153 72.8,9.403 72.8,10.061 U11.30@74.193,11.454
ANODE_1: RA5.6 U11.29 | length 2.9
  Top Layer w0.254: RA5.6@71.984,9.718 72.346,10.08 72.346,10.314 U11.29@73.84,11.808
ANODE_2: RA5.7 U11.28 | length 3
  Top Layer w0.254: RA5.7@71.318,10.184 71.78,10.646 71.971,10.646 U11.28@73.486,12.161
ANODE_3: RA5.8 U11.27 | length 3.1
  Top Layer w0.254: RA5.8@70.753,10.75 71.103,11.1 71.718,11.1 U11.27@73.133,12.515
ANODE_4: RA6.5 U11.26 | length 6.2
  Top Layer w0.254: RA6.5@68.05,9.4 68.481,9.4 70.679,11.598 71.508,11.598 U11.26@72.779,12.868
ANODE_5: RA6.6 U11.25 | length 5.6
  Top Layer w0.254: RA6.6@68.05,10.2 68.639,10.2 70.49,12.052 71.255,12.052 U11.25@72.426,13.222
ANODE_6: RA6.7 U11.24 | length 5.1
  Top Layer w0.254: RA6.7@68.05,11 68.797,11 70.302,12.506 71.002,12.506 U11.24@72.072,13.576
ANODE_7: RA6.8 U11.21 | length 5.2
  Top Layer w0.254: RA6.8@68.05,11.8 68.05,13.65 68.277,13.877 69.289,13.877 69.56,13.877 70.252,13.877 U11.21@71.011,14.636
BOOT0: R12.2 R18.1 U11.60 | length 24.7
  Top Layer w0.254: v1(74.1,16.4) 76.026,18.326 ccw(c75.846,18.505) 76.049,18.353 ccw(c75.846,18.505) 76.1,18.505 76.1,20.195 cw(c76.354,20.195) 76.151,20.347 cw(c76.354,20.195) 76.174,20.374 76.573,20.773 77.148,20.773 U11.60@79.214,22.839
  Top Layer w0.3: R18.1@60.1,14.5 v1(60.1,15.1) R12.2@60.1,15.7
  Bottom Layer w0.254: v1(60.1,15.1) 60.166,15.034 60.411,15.034 60.418,15.027 72.727,15.027 v1(74.1,16.4)
BUTTON_FN: C1.1 R1.2 SW1.1 U11.11 | length 36.4
  Top Layer w0.254: v1(47.04,27.84) 47.4,28.2 R1.2@47.4,29 ; R1.2@47.4,29.05 47.888,29.538 47.888,29.862 47.308,30.442 47.3,30.442 47.3,30.8 SW1.1@48.75,32.25 ; U11.11@71.365,20.717 72.585,19.497 v1(72.585,19.415)
  Bottom Layer w0.254: v1(47.04,27.84) 48.454,26.425 65.575,26.425 v1(72.585,19.415)
BUTTON_LEFT: C2.1 R2.2 SW2.1 U11.10 | length 23.7
  Top Layer w0.254: v1(60.25,27.5) 60.275,27.525 60.275,28.975 R2.2@60.3,29 ; R2.2@60.3,29.05 60.788,29.538 60.788,29.862 60.3,30.35 60.3,30.8 SW2.1@61.75,32.25 ; U11.10@71.718,21.071 72.439,20.35 72.921,20.35 v1(73.221,20.05)
  Bottom Layer w0.254: v1(60.25,27.5) 60.85,26.9 65.742,26.9 72.592,20.05 v1(73.221,20.05)
BUTTON_OK: C3.1 R3.2 SW3.1 U11.9 | length 15.9
  Top Layer w0.254: v1(69.8,28.15) 69.8,29.05 70.288,29.538 70.288,29.862 69.8,30.35 69.8,30.8 SW3.1@71.25,32.25 ; U11.9@72.072,21.424 72.084,21.424 72.668,20.841 73.341,20.841 v1(73.35,20.85)
  Bottom Layer w0.254: v1(69.8,28.15) 69.8,23.517 72.467,20.85 v1(73.35,20.85)
BUTTON_RIGHT: C4.1 R4.2 SW4.1 U11.8 | length 16.8
  Top Layer w0.254: R4.2@79.3,29 v1(79.3,29.7) 79.3,30.8 SW4.1@80.75,32.25
  Top Layer w0.3: v1(71.672,22.531) U11.8@72.426,21.778
  Bottom Layer w0.254: v1(71.672,22.531) 71.672,24.797 73.775,26.9 73.783,26.9 73.787,26.904 76.504,26.904 v1(79.3,29.7)
C0: Q1.1 RA1.4 | length 7.3
  Top Layer w0.254: RA1.4@87.65,28.4 87.95,28.575 88.593,30.078 88.593,30.08 cw(c89.08,29.87) 88.952,30.384 88.956,30.385 cw(c89.08,29.87) 89.08,30.4 92.446,30.4 ccw(c92.446,30.85) 92.824,30.606 93.14,31.1 Q1.1@93.3,31.35
C1: Q2.1 RA1.3 | length 2.9
  Top Layer w0.254: RA1.3@87.65,27.6 87.95,27.625 88.035,27.625 ccw(c88.035,28.14) 88.523,27.977 88.577,28.138 cw(c89.08,27.97) 88.606,28.206 89.15,29.3 Q2.1@89.5,29.55
C2: Q3.1 RA1.2 | length 5.8
  Top Layer w0.254: RA1.2@87.65,26.8 89.922,26.8 ccw(c89.92,27.33) 90.042,26.814 92.95,27.5 Q3.1@93.3,27.75
C3: Q4.1 RA1.1 | length 1.9
  Top Layer w0.254: RA1.1@87.65,26 87.95,25.959 89.15,25.959 Q4.1@89.5,25.95
C4: Q5.1 RA2.4 | length 5.8
  Top Layer w0.254: RA2.4@87.65,24.8 87.973,24.777 89.08,24.777 89.921,24.777 cw(c89.92,24.37) 90.023,24.764 90.433,24.657 cw(c90.275,24.05) 90.509,24.632 90.511,24.631 91.328,24.302 ccw(c91.48,24.68) 91.48,24.273 92.927,24.273 Q5.1@93.3,24.15
C5: Q6.1 RA2.3 | length 2.7
  Top Layer w0.254: RA2.3@87.65,24 87.973,24.11 88.079,24.036 cw(c87.933,23.828) 88.126,23.993 88.623,23.413 cw(c88.085,22.953) 88.663,23.362 89.186,22.623 Q6.1@89.5,22.35
C6: Q7.1 RA2.2 | length 6.9
  Top Layer w0.254: RA2.2@87.65,23.2 87.973,23.257 88.165,23.194 cw(c88.085,22.953) 88.326,23.033 88.46,22.62 88.693,21.904 ccw(c89.08,22.03) 88.931,21.651 90.504,21.034 cw(c90.275,20.45) 90.509,21.032 91.328,20.702 ccw(c91.48,21.08) 91.479,20.673 92.927,20.673 Q7.1@93.3,20.55
C7: Q8.1 RA2.1 | length 4.1
  Top Layer w0.254: RA2.1@87.65,22.4 87.715,22.202 87.717,22.196 ccw(c87.958,22.276) 87.726,22.173 89.127,19.023 Q8.1@89.5,18.75
C8: Q9.1 RA3.4 | length 7.1
  Top Layer w0.254: RA3.4@87.65,14 87.95,14.175 88.593,15.678 88.593,15.68 cw(c89.08,15.47) 88.952,15.984 88.956,15.985 cw(c89.08,15.47) 89.08,16 90.45,16 ccw(c90.45,16.3) 90.522,16.009 92.996,16.617 ccw(c92.924,16.908) 93.14,16.7 Q9.1@93.3,16.95
C9: Q10.1 RA3.3 | length 2.9
  Top Layer w0.254: RA3.3@87.65,13.2 87.95,13.225 88.035,13.225 ccw(c88.035,13.74) 88.523,13.577 88.577,13.738 cw(c89.08,13.57) 88.606,13.806 89.15,14.9 Q10.1@89.5,15.15
C10: Q11.1 RA3.2 | length 5.8
  Top Layer w0.254: RA3.2@87.65,12.4 89.922,12.4 ccw(c89.92,12.93) 90.042,12.414 92.95,13.1 Q11.1@93.3,13.35
C11: Q12.1 RA3.1 | length 1.9
  Top Layer w0.254: RA3.1@87.65,11.6 87.95,11.559 89.15,11.559 Q12.1@89.5,11.55
C12: Q13.1 RA4.4 | length 5.8
  Top Layer w0.254: RA4.4@87.65,10.4 87.973,10.377 89.08,10.377 89.921,10.377 cw(c89.92,9.97) 90.023,10.364 90.433,10.257 cw(c90.275,9.65) 90.509,10.232 90.511,10.231 91.328,9.902 ccw(c91.48,10.28) 91.48,9.873 92.927,9.873 Q13.1@93.3,9.75
C13: Q14.1 RA4.3 | length 2.7
  Top Layer w0.254: RA4.3@87.65,9.6 87.973,9.71 88.079,9.636 cw(c87.933,9.428) 88.126,9.593 88.623,9.013 cw(c88.085,8.553) 88.663,8.962 89.186,8.223 Q14.1@89.5,7.95
C14: Q15.1 RA4.2 | length 6.9
  Top Layer w0.254: RA4.2@87.65,8.8 87.973,8.857 88.165,8.794 cw(c88.085,8.553) 88.326,8.633 88.46,8.22 88.693,7.504 ; 88.693,7.503 ccw(c89.08,7.63) 88.931,7.251 90.504,6.634 cw(c90.275,6.05) 90.509,6.632 91.328,6.302 ccw(c91.48,6.68) 91.479,6.273 92.927,6.273 Q15.1@93.3,6.15
C15: Q16.1 RA4.1 | length 4.1
  Top Layer w0.254: RA4.1@87.65,8 87.715,7.802 87.717,7.796 ccw(c87.958,7.876) 87.726,7.773 89.127,4.623 Q16.1@89.5,4.35
CATHODE_0: RA1.5 U11.62 | length 9.4
  Top Layer w0.254: U11.62@78.507,23.546 79.19,24.229 81.18,24.229 ccw(c81.18,24.483) 81.359,24.303 81.391,24.335 cw(c81.57,24.155) 81.434,24.369 ccw(c81.1,24.9) 81.546,24.46 83.508,26.443 ccw(c83.22,26.73) 83.547,26.487 cw(c83.75,26.335) 83.569,26.513 85.358,28.302 cw(c85.537,28.122) 85.472,28.367 85.565,28.392 cw(c85.63,28.146) 85.627,28.4 RA1.5@85.95,28.4
CATHODE_1: RA1.6 U11.61 | length 8.9
  Top Layer w0.254: U11.61@78.86,23.192 78.873,23.192 79.456,23.775 81.63,23.775 85.38,27.526 cw(c85.56,27.346) 85.56,27.6 RA1.6@85.95,27.6
CATHODE_2: RA1.7 U11.57 | length 7.8
  Top Layer w0.254: U11.57@80.274,21.778 85.296,26.8 RA1.7@85.95,26.8
CATHODE_3: RA1.8 U11.56 | length 7.2
  Top Layer w0.254: U11.56@80.628,21.424 83.984,24.781 ccw(c83.804,24.959) 84.021,24.829 cw(c84.95,24.275) 84.21,25.063 85.135,25.931 cw(c85.309,25.746) 85.309,26 RA1.8@85.95,26
CATHODE_4: RA2.5 U11.55 | length 6.6
  Top Layer w0.254: U11.55@80.982,21.071 84.299,24.388 ccw(c84.118,24.567) 84.356,24.476 84.364,24.499 cw(c84.95,24.275) 84.759,24.872 ; 84.76,24.873 84.814,24.89 cw(c84.892,24.648) 84.892,24.902 85.21,24.902 85.312,24.8 RA2.5@85.95,24.8
CATHODE_5: RA2.6 U11.53 | length 5.8
  Top Layer w0.254: U11.53@81.689,20.364 84.973,23.648 85.21,23.648 85.439,23.877 85.827,23.877 RA2.6@85.95,24
CATHODE_6: RA2.7 U11.52 | length 5.2
  Top Layer w0.254: U11.52@82.042,20.01 84.965,22.933 85.106,22.933 85.373,23.2 RA2.7@85.95,23.2
CATHODE_7: RA2.8 U11.51 | length 4.7
  Top Layer w0.254: U11.51@82.396,19.657 85.139,22.4 RA2.8@85.95,22.4
CATHODE_8: RA3.5 U11.40 | length 6.5
  Top Layer w0.254: U11.40@80.274,13.222 80.918,12.578 83.951,12.578 85.373,14 RA3.5@85.95,14
CATHODE_9: RA3.6 U11.39 | length 6.8
  Top Layer w0.254: U11.39@79.921,12.868 80.665,12.124 84.297,12.124 85.373,13.2 RA3.6@85.95,13.2
CATHODE_10: RA3.7 U11.38 | length 7
  Top Layer w0.254: U11.38@79.567,12.515 80.412,11.67 84.643,11.67 85.373,12.4 RA3.7@85.95,12.4
CATHODE_11: RA3.8 U11.37 | length 7.3
  Top Layer w0.254: U11.37@79.214,12.161 80.159,11.216 84.989,11.216 85.373,11.6 RA3.8@85.95,11.6
CATHODE_12: RA4.5 U11.36 | length 7.7
  Top Layer w0.254: U11.36@78.86,11.808 79.906,10.762 84.933,10.762 cw(c84.933,10.508) 85.085,10.711 cw(c84.933,10.508) 85.112,10.688 85.326,10.474 ccw(c85.505,10.654) 85.505,10.4 RA4.5@85.95,10.4
CATHODE_13: RA4.6 U11.35 | length 8.2
  Top Layer w0.254: U11.35@78.507,11.454 79.653,10.308 84.562,10.308 cw(c84.562,10.054) 84.714,10.257 cw(c84.562,10.054) 84.741,10.234 85.299,9.676 ccw(c85.478,9.856) 85.476,9.602 85.627,9.602 RA4.6@85.95,9.6